# Altium PCB GPS.PcbDoc
Units mm, origin at the board's own origin, x right, y up, seen from the top; angles counter-clockwise.
Board outline 101.53 x 61.5 mm, 4 copper layers (Top Layer, GND, Power layer, Bottom Layer), stack 1.586 mm thick; 16 components, 24 nets, 85 pads, 40 vias.
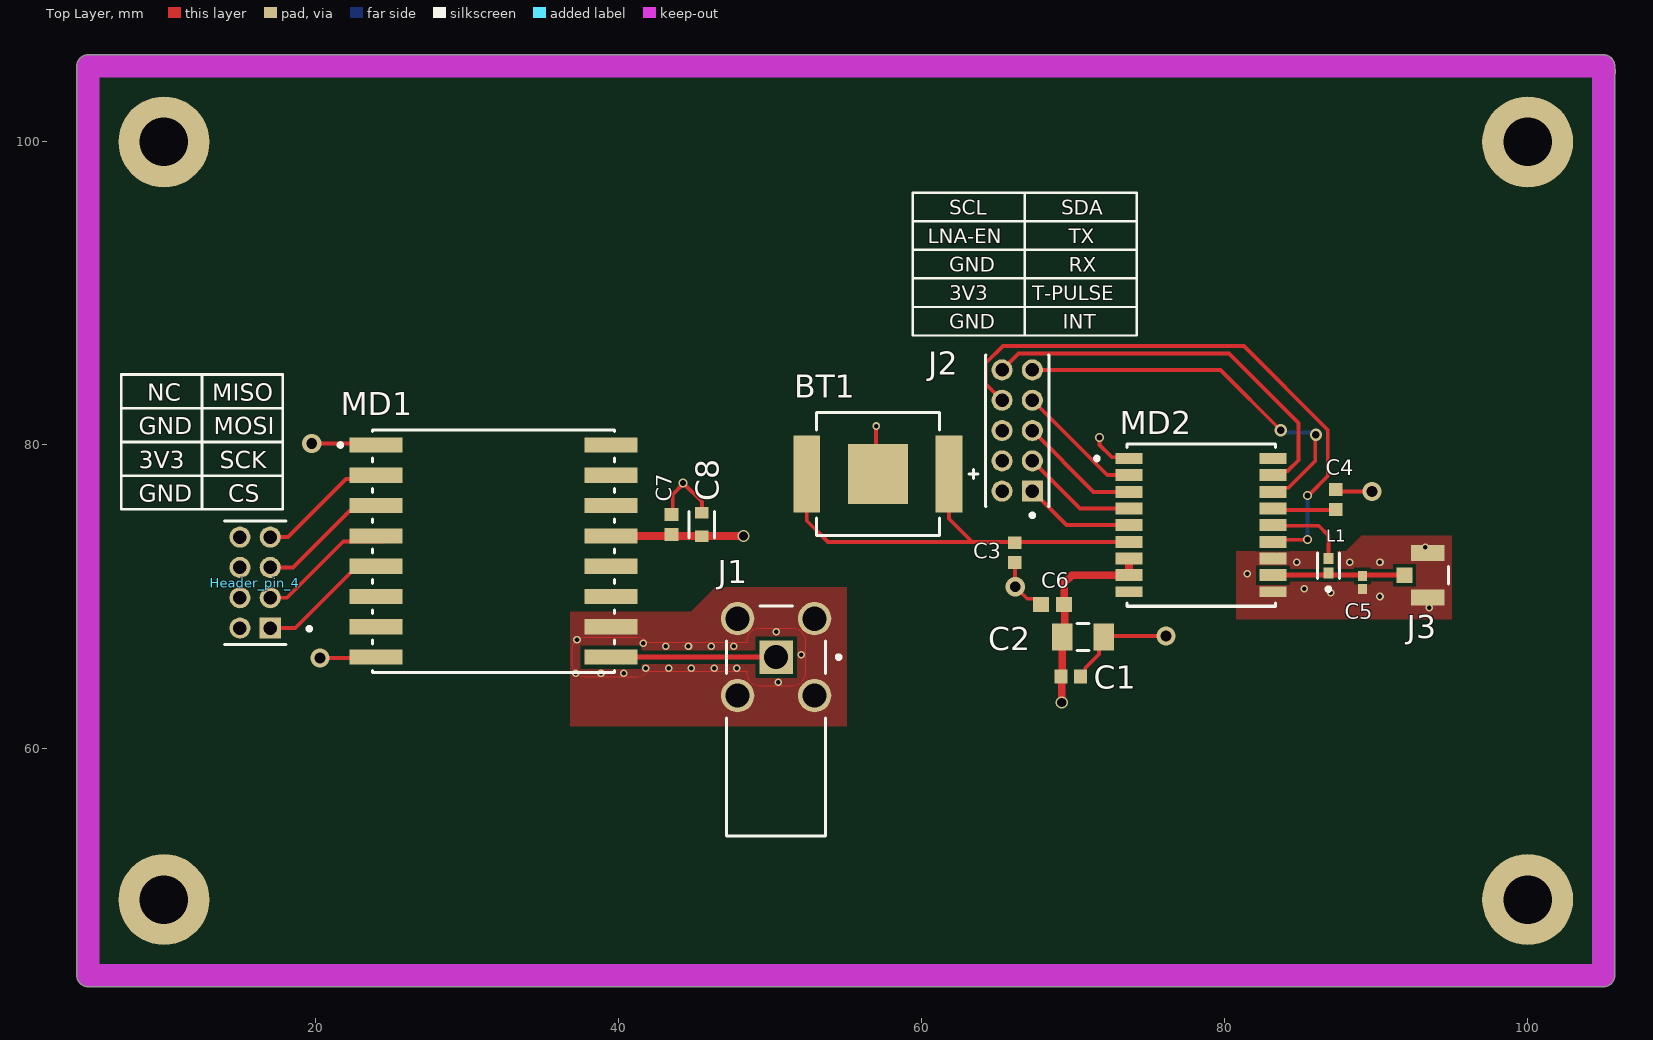
[diagram p0: Top Layer view]
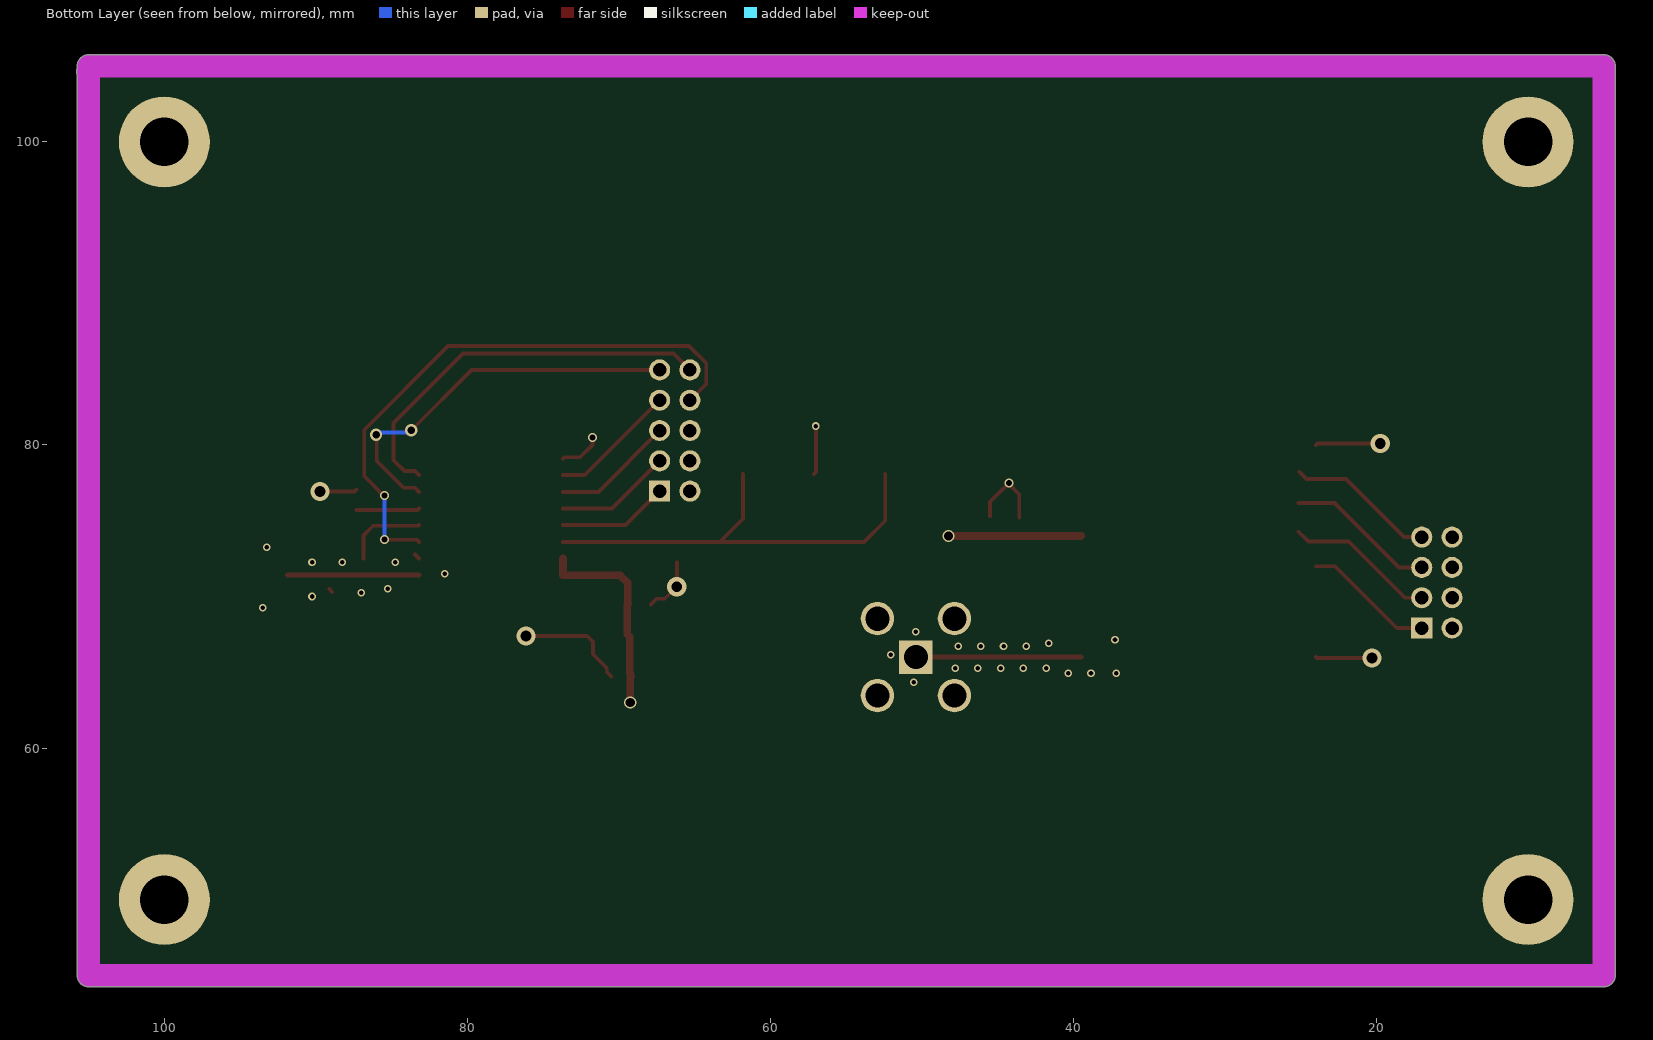
[diagram p1: Bottom Layer view, seen from below]
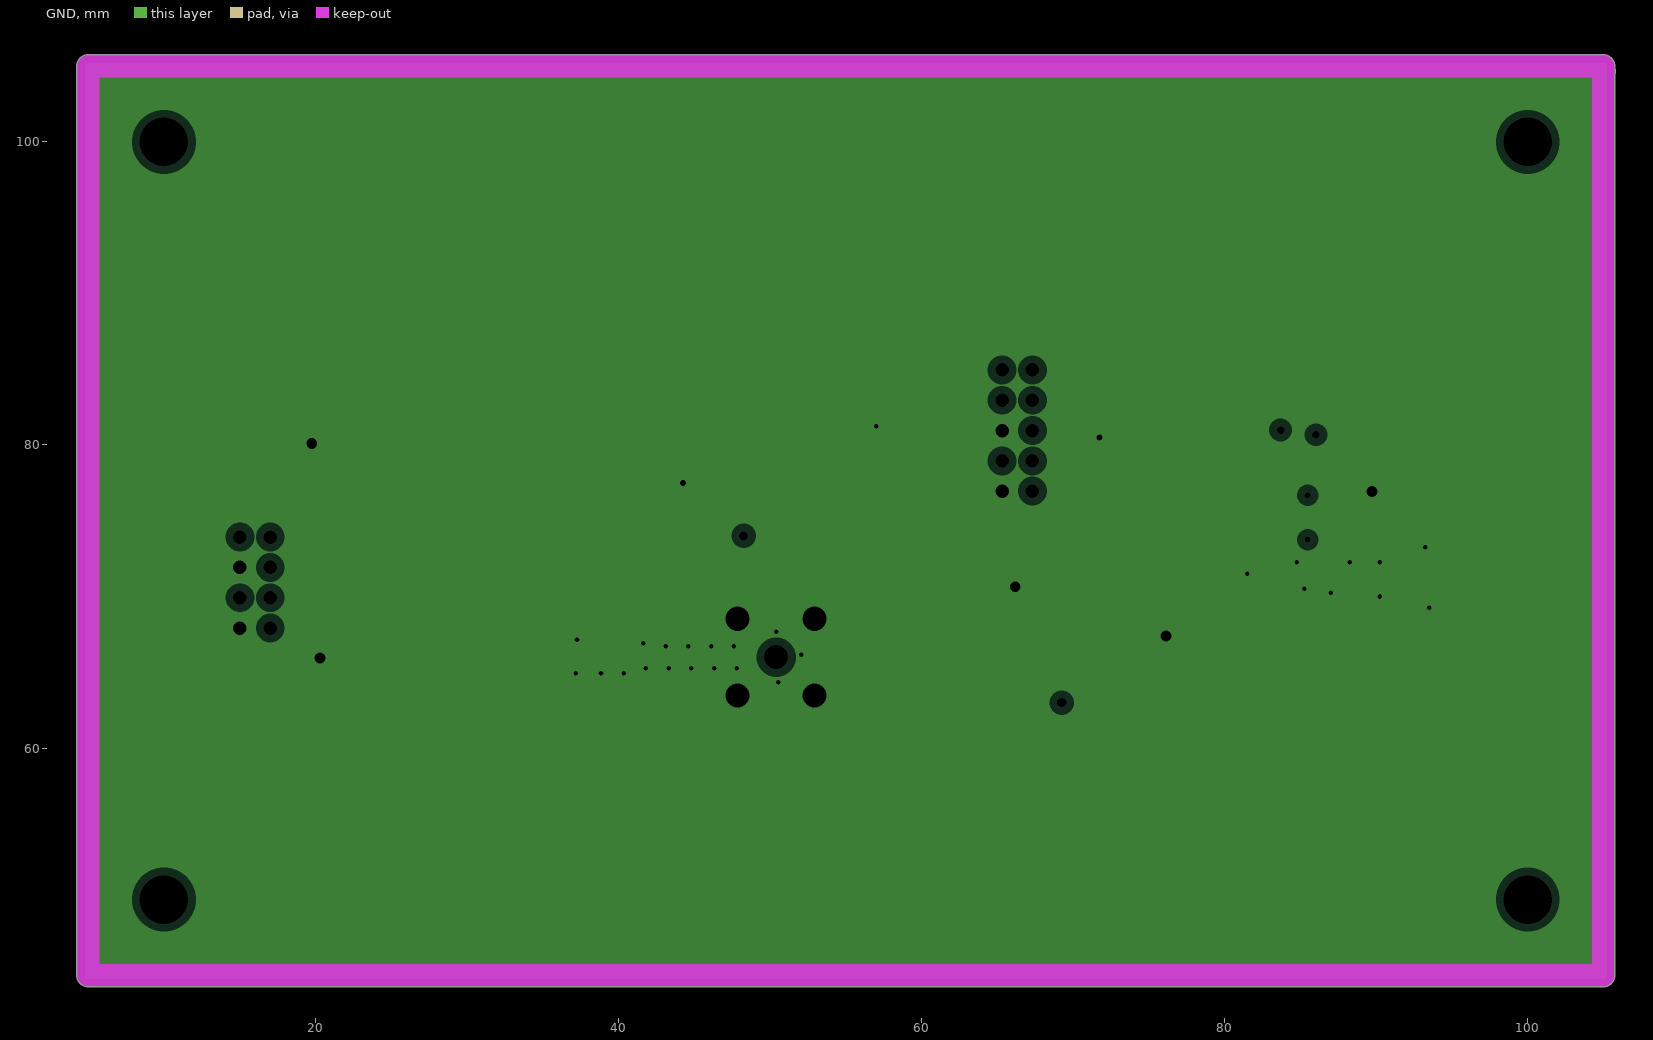
[diagram p2: GND, clearances drawn from the general rule]
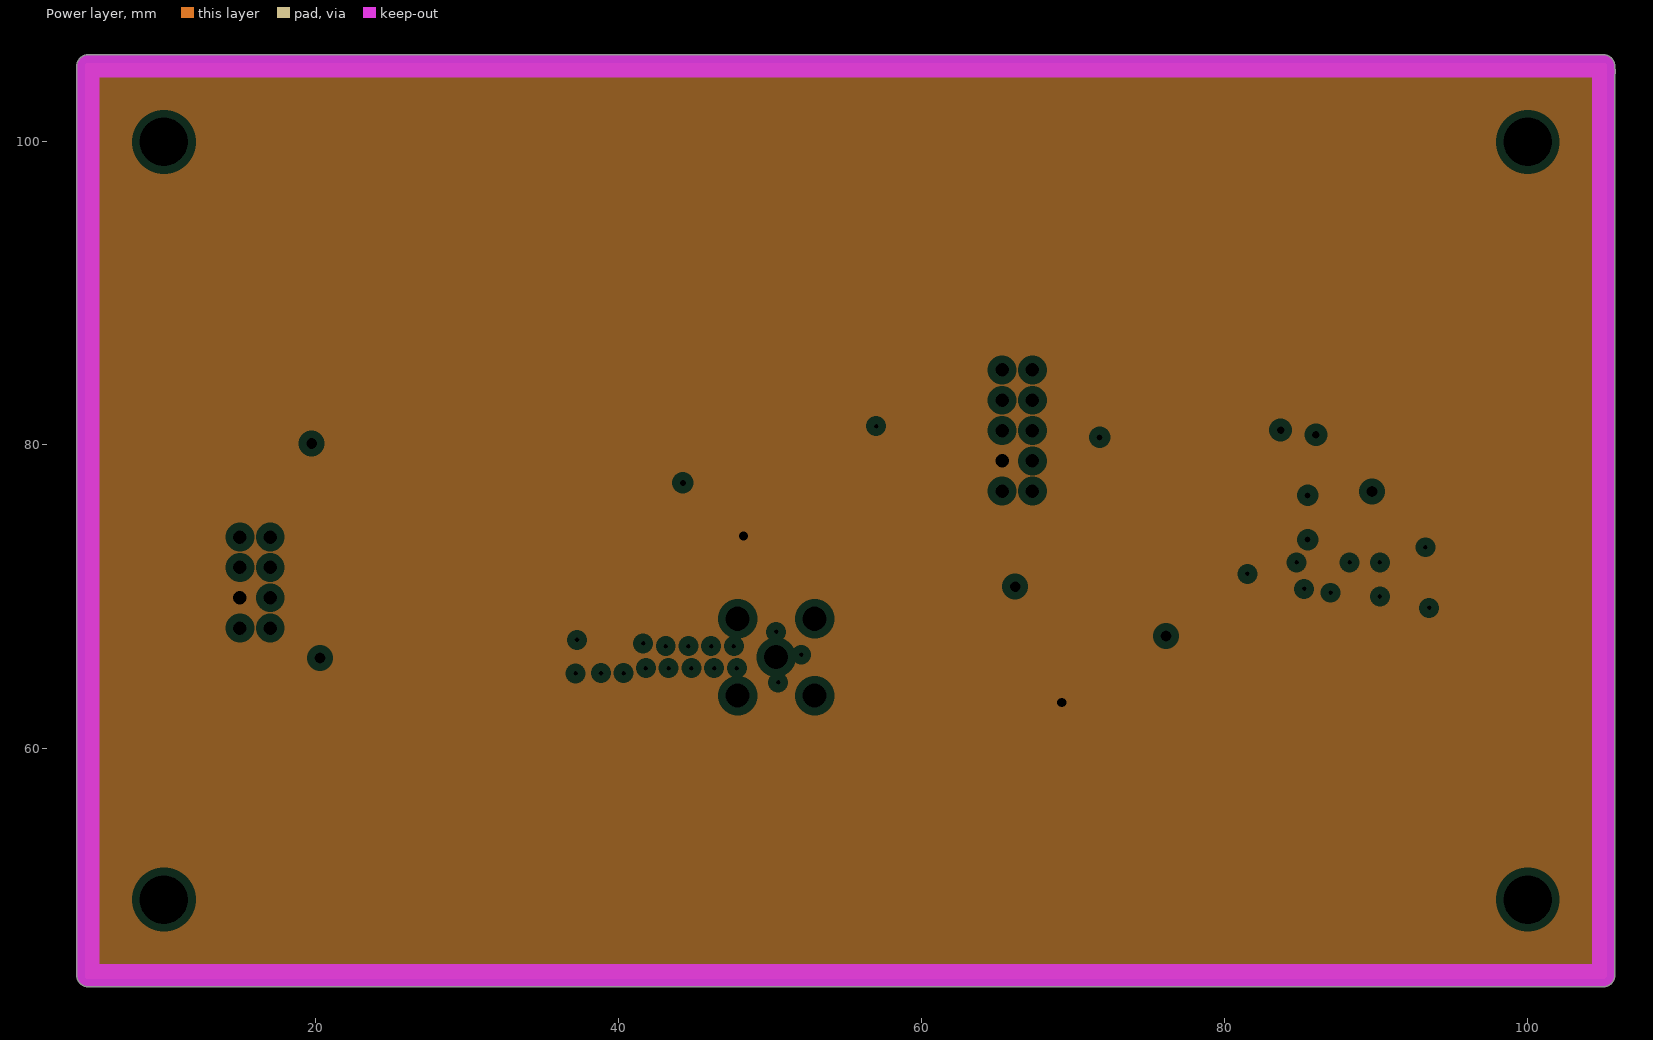
[diagram p3: Power layer, clearances drawn from the general rule]
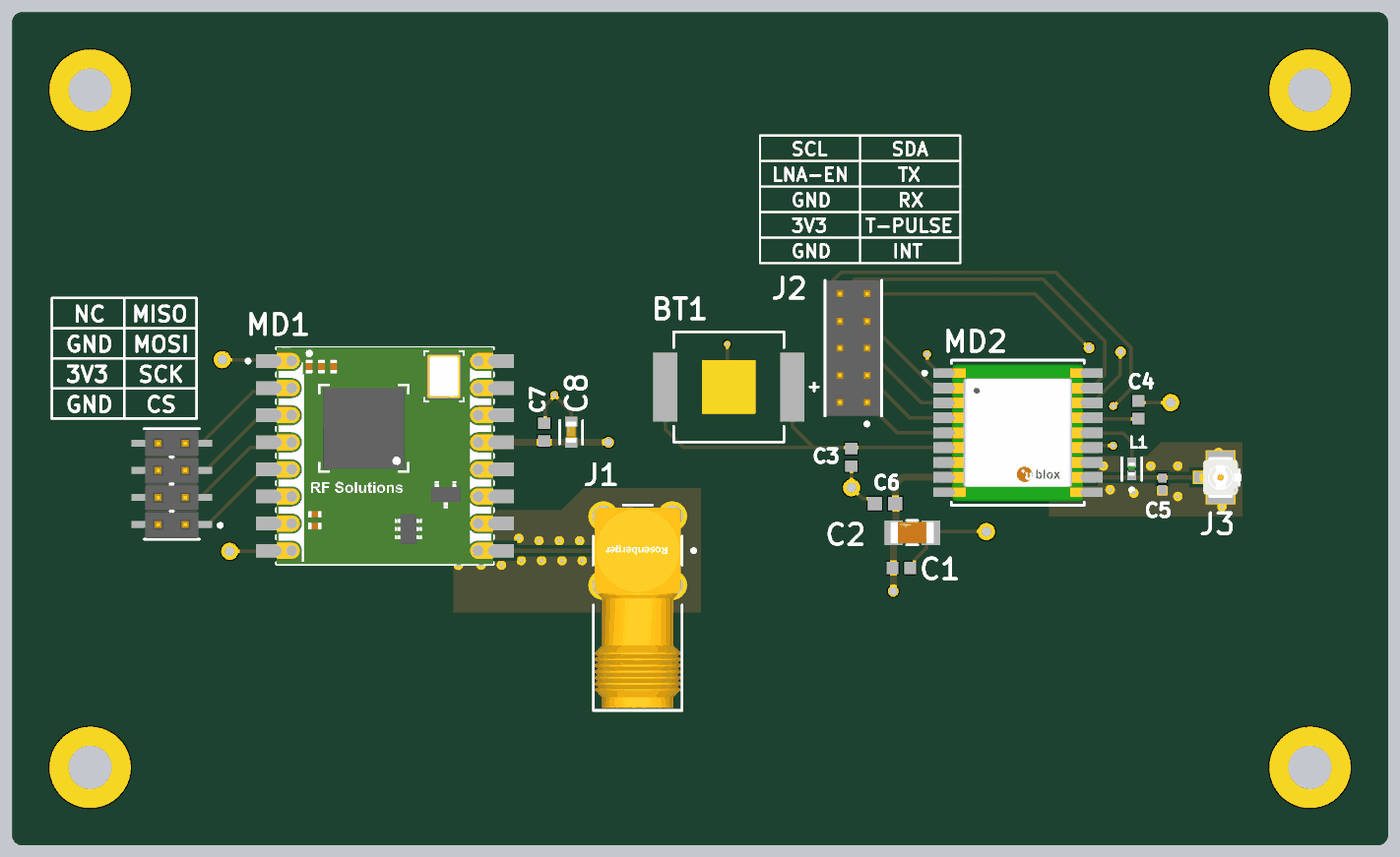
[diagram p4: 3D render of the assembled board from above, using the file's embedded part models]

## Layer stack, top to bottom
Top Solder: solder mask 0.0152, Solder Resist, Dk 3.8
Top Layer: signal copper 0.035
Dielectric 2: prepreg 0.2104, PP-006, Dk 4.4
GND: plane copper 0.0152, net GND
Dielectric 1: dielectric 1.065, FR-4, Dk 4.6
Power layer: plane copper 0.0152, net 3V3
Dielectric 3: prepreg 0.2104, PP-006, Dk 4.4
Bottom Layer: signal copper 0.035
Bottom Solder: solder mask 0.0152, Solder Resist, Dk 3.8

## Board outline
5,44.25 cw(c5,45) 4.25,45 4.25,105 cw(c5,105) 5,105.75 105,105.75 cw(c105,105) 105.75,105 105.75,104.842 cw(c105.025,104.65) 105.775,104.65 cw(c105.025,104.65) 105.75,104.458 105.75,45 cw(c105,45) 105,44.25

## Design rules (kind name [scope] priority, off if disabled: settings)
Clearance [All] p1: gap=0.254 ignorepadtopadclearanceinfootprint=TRUE
HoleSize [All] p1: absolutevalues=TRUE maxlimit=10 minlimit=0.2 maxpercent=80.000 minpercent=20.000
MinimumSolderMaskSliver [All] p1: minsoldermaskwidth=0.2
PlaneClearance [All] p1: clearance=0.508
PlaneConnect [All] p1: planeconnectstyle=Relief reliefexpansion=0.508 reliefentries=4 reliefconductorwidth=0.254 reliefairgap=0.254
PolygonConnect GNDConnect [InNet('GND') vs InNet('GND')] p1: connectstyle=Direct reliefconductorwidth=0.254 reliefentries=4 polygonreliefangle="90 Angle" airgapwidth=0.254
PolygonConnect [All] p2: connectstyle=Relief reliefconductorwidth=0.254 reliefentries=4 polygonreliefangle="90 Angle" airgapwidth=0.254
RoutingVias [All] p1: holewidth=0.3 width=0.5 viastyle="Through Hole" minholewidth=0.2 minwidth=0.35 maxholewidth=0.711 maxwidth=1.27
SilkToSolderMaskClearance [IsPad] p1: minsilkscreentomaskgap=0.2 clearancetoexposedcopper=TRUE
SolderMaskExpansion [All] p1: expansion=0.102 istentingtop=FALSE
SupplyNets "Schematic Supply Nets_2" [InNet('VCC')] p1: voltage=0.000
SupplyNets "Schematic Supply Nets_1" [InNet('3V3')] p2: voltage=0.000
SupplyNets "Schematic Supply Nets" [InNet('GND')] p3: voltage=0.000
Width Width_1 [InNetClass('RF')] p1: maxlimit=0.33 minlimit=0.33 preferedwidth=0.33 impedanceprofiledriven=TRUE impedanceprofileid={B25F2D5E-86D3-4013-A221-06050CDA0AEF} impedanceprofilevalue=50.000000 minimp=50.000000 maximp=50.000000 favimp=50.000000
Width [All] p2: maxlimit=1.27 minlimit=0.254 preferedwidth=0.254 minimp=50.000000 maximp=50.000000 favimp=50.000000
25 further rules are at their usual default settings.

## Classes and differential pairs
net class RF: NetC5_2 NetJ1_1
component class Radio_gps_module: BT1 C1 C2 C3 C4 C5 C6 C7 C8 Header_pin J2 J3 L1 MD1 MD2

## Components (designator, comment, footprint, x,y, rotation, side; value= is the part's Value field where it differs from the comment)
BT1 "2998" FP-2998-MFG 57.121,78.083 r180 top
C1 "06035C104KAZ2A" CAPC1608X90X35LL15T15 69.85,64.725 r180 top
C2 "GRM31CR71E106MA12K" FP-GRM31C-0_2-e0_3_0_8-IPC_B 70.65,67.325 r180 top
C3 "06035C104KAZ2A" CAPC1608X90X35LL15T15 66.15,72.9 r90 top
C4 "06035C104KAZ2A" CAPC1608X90X35LL15T15 87.325,76.4 r270 top
C5 "C0402C103K4RALTU" CAPC1005X60X30NL05T10 89.1,70.925 r90 top
C6 "06035C104KAZ2A" CAPC1608X90X35NL15T15 68.64,69.482 r0 top
C7 "06035C104KAZ2A" CAPC1608X90X35LL15T15 43.5,74.75 r270 top
C8 "GRM188R61A106KE69D" FP-GRM18-0_15-MFG 45.5,74.75 r90 top value=10uF (schematic designator C10uF)
Header_pin_4 "TMM-104-01-L-D" FP-TMM-104-01-L-D-MFG 16.018,70.92 r90 top
J1 "32K201-400L5" FP-32K201-400L5-MFG 50.4,61.787 r180 top
J2 "TMM-105-01-L-D" FP-TMM-105-01-L-D-MFG 66.31,80.953 r90 top
J3 "U.FL-R-SMT-1(10)" FP-U_FL-R-SMT-1_10-MFG 93.4,71.408 r90 top
L1 "LQG15HS27NH02D" FP-LQG15HH_02-IPC_A 86.85,72.025 r90 top (schematic designator Inductor)
MD1 "RFM95W-868S2" FP-RFM95W-868S2-MFG 31.75,73 r0 top
MD2 "MAX-M10S-00B" FP-MAX-M10S-00B-MFG 78.442,74.708 r0 top

## Footprints (in the part's own frame and the unit in brackets; to place one, negate y for a bottom-side part, rotate by r counter-clockwise, add the part's x,y. Pads: shape width x height; smd on the part's side, far side on the other; paste and mask are expansions set on the pad)
CAPC1005X60X30NL05T10 [mm] "Chip Capacitor, 2-Leads, Body 1.00x0.50mm, IPC Medium Density"
  rect 0.66x0.62 smd: 1(-0.43,0) 2(0.43,0)
  body extent -0.53,-0.28 0.53,0.27, height 0.6
CAPC1608X90X35LL15T15 [mm] "Chip Capacitor, 2-Leads, Body 1.60x0.81mm, IPC High Density"
  rect 0.85x0.9 smd: 1(-0.65,0) 2(0.65,0)
  body extent -0.88,-0.48 0.87,0.48, height 0.9
CAPC1608X90X35NL15T15 [mm] "Chip Capacitor, 2-Leads, Body 1.60x0.81mm, IPC Medium Density"
  rect 1.05x1 smd: 1(-0.75,0) 2(0.75,0)
  body extent -0.88,-0.48 0.87,0.48, height 0.9
FP-32K201-400L5-MFG [mm]
  rect 2.2x2.2 hole 1.6 paste-2539.97 mask+0: 1(0,-4.213)
  round 2.2 hole 1.6 paste-2539.97 mask+0: 2(-2.54,-1.673) 3(2.54,-1.673) 4(-2.54,-6.753) 5(2.54,-6.753)
  silkscreen extent -4.25,-7.59 3.27,7.59, body extent -3.74,-7.95 3.74,7.69, height 0.25
FP-2998-MFG [mil]
  rect 156x156 smd paste-39370.1 mask+0: 1(0,0)
  rect 70x200 smd paste+0 mask+0: 2(-185,0) 2(185,0)
  silkscreen extent -260,-160 160,160
FP-GRM18-0_15-MFG [mm]
  rect 0.75x0.9 smd paste+0 mask+0: 1(-0.775,0) 2(0.775,0)
  silkscreen extent -0.88,-0.83 0.87,0.85, body extent -1.25,-0.58 1.25,0.58, height 0.25
FP-GRM31C-0_2-e0_3_0_8-IPC_B [mm]
  rect 1.355x1.806 smd paste+0 mask+0: 1(-1.376,0) 2(1.376,0)
  silkscreen extent -0.4,-0.9 0.4,0.9, body extent -2.3,-1.15 2.3,1.15, height 0.25
FP-LQG15HH_02-IPC_A [mm]
  rect 0.715x0.672 smd paste+0 mask+0: 1(-0.479,0) 2(0.479,0)
  silkscreen extent -1.66,-0.74 0.84,0.74, body extent -1.04,-0.54 1.04,0.54, height 0.25
FP-MAX-M10S-00B-MFG [mm]
  rect 1.8x0.7 smd paste-1000 mask+0: 1(-4.75,4.4) 9(-4.75,-4.4) 10(4.75,-4.4) 18(4.75,4.4)
  rect 1.8x0.8 smd paste-1000 mask+0: 2(-4.75,3.3) 3(-4.75,2.2) 4(-4.75,1.1) 5(-4.75,0) 6(-4.75,-1.1) 7(-4.75,-2.2) 8(-4.75,-3.3) 11(4.75,-3.3) 12(4.75,-2.2) 13(4.75,-1.1) 14(4.75,0) 15(4.75,1.1) 16(4.75,2.2) 17(4.75,3.3)
  silkscreen extent -7,-5.35 4.9,5.35, body extent -5.75,-5.45 5.75,5.45, height 0.25
FP-RFM95W-868S2-MFG [mm]
  rect 3.5x1 smd paste+0 mask+0: 1(-7.75,7) 2(-7.75,5) 3(-7.75,3) 4(-7.75,1) 5(-7.75,-1) 6(-7.75,-3) 7(-7.75,-5) 8(-7.75,-7) 9(7.75,-7) 10(7.75,-5) 11(7.75,-3) 12(7.75,-1) 13(7.75,1) 14(7.75,3) 15(7.75,5) 16(7.75,7)
  silkscreen extent -10.22,-8 8,8, body extent -9.6,-8.1 9.6,8.1, height 0.25
FP-TMM-104-01-L-D-MFG [mm]
  rect 1.39x1.39 hole 0.89 paste-2539.97 mask+0: 1(-3,-1)
  round 1.39 hole 0.89 paste-2539.97 mask+0: 2(-3,1) 3(-1,-1) 4(-1,1) 5(1,-1) 6(1,1) 7(3,-1) 8(3,1)
  silkscreen extent -4.08,-3.7 4.08,2.03, body extent -4.1,-3.07 4.1,3.07, height 0.25
FP-TMM-105-01-L-D-MFG [mm]
  rect 1.39x1.39 hole 0.89 paste-2539.97 mask+0: 1(-4,-1)
  round 1.39 hole 0.89 paste-2539.97 mask+0: 2(-4,1) 3(-2,-1) 4(-2,1) 5(0,-1) 6(0,1) 7(2,-1) 8(2,1) 9(4,-1) 10(4,1)
  silkscreen extent -5.72,-2.09 5,2.09, body extent -5.1,-2.13 5.1,2.13, height 0.25
FP-U_FL-R-SMT-1_10-MFG [mm]
  rect 1x1.05 smd paste-1000 mask+0: 1(0,1.525)
  rect 1.05x2.2 smd paste-1000 mask+0: 2(-1.475,0) 3(1.475,0)
  silkscreen extent -0.58,-1.38 0.58,-1.38, body extent -2.1,-1.48 2.1,2.15, height 0.25

## Part data
BT1: library part CMP-19636-000010-1, "BATTERY RETAINER COIN 6.8MM SMD", Case/Package=SMD/SMT, Color=Silver, Package Quantity=100, Contact Material=Bronze, Height=2.9mm, Lead Free="Lead Free", Material=Bronze, Mount="Surface Mount", Number of Batteries=1, Number of Cells=1, REACH SVHC="No SVHC", Termination=SMD/SMT
C1 C3 C4 C6 C7: library part CMP-2006-04391-1, Manufacturer="AVX Interconnect / Elco", Part Number=06035C104KAZ2A
C2: library part CMP-06035-043219-1, "Chip Multilayer Ceramic Capacitors for General Purpose, 1206, 10uF, X7R, 15%, 20%, 25V"
C5: library part CMP-2008-02128-1, Manufacturer=Kemet, Part Number=C0402C103K4RALTU
C8: library part CMP-2000-05448-2, "CAP CER 10UF 10V X5R 0603", Capacitance=10uF, Manufacturer=Murata, Package=GRM18-0.15, Temperature="-55°C to +85°C", Temperature Characteristic=X5R, Temperature Coefficient=15%, Temperature Range High=+85°C, Temperature Range Low=-55°C, Tolerance=10%, Voltage Rating=10V, Automotive=No, Category=Cap, ComponentLink2Description=Datasheet, ComponentLink2URL=https://search.murata.co.jp/Ceramy/image/img/A01X/G101/ENG/GRM188R61A106KE69-01A.pdf, Device Class L1="Passive Components", Device Class L2=Capacitors, Device Class L3="Ceramic Capacitors", Digikey Description="CAP CER 10UF 10V X5R 0603", Height=0.95mm, Lead Free=Yes, Manufacturer Part Number=GRM188R61A106KE69D, Material=Ceramic, Mouser Description="Multilayer Ceramic Capacitors MLCC - SMD/SMT 0603 10uF 10volts X5R + - 10%", Octopart=https://octopart.com/grm188r61a106ke69d-murata-22851381, RoHS=TRUE
Header_pin_4: library part CMP-02766-001625-1, "CONN HEADER VERT 8POS 2MM", Housing Color=Black, Max Current Rating=3.9A, Max Operating Temperature=125°C, Max Voltage Rating (AC)=500V, Min Operating Temperature=-55°C, Connector Type=Header, Contact Finish - Mating=GOLD, Contact Material=Bronze, Contact Plating=Gold, Contact Shape=Square, Contact Type="Male Pin", Depth=3.94mm, Fastening Type=Pull, Gender=Male, Housing Material=Polymer, Insulation Color=Black, Insulation Material=Polymer, Lead Free="Lead Free", Length=8mm, Number Of Contacts=8, Number of Positions=8, Number of Rows=2, Orientation=Straight, Packaging=Bulk, Pitch=2mm, Radiation Hardening=No, REACH SVHC="No SVHC", RoHS Compliant=Yes, Series=TMM, Termination=Solder
J1: library part CMP-0751-00005-2, "CONN SMA JACK R/A 50OHM PCB", Case/Package=SMA, Dielectric Material=PTFE, Housing Color=Gold, Max Frequency=18GHz, Max Operating Temperature=165°C, Min Operating Temperature=-65°C, Voltage Rating=480V, Body Material=Brass, Body Plating=Gold, Center Contact Plating=Gold, Connector Type=SMA, Contact Material=Copper, Contact Plating=Gold, Fastening Type=Threaded, Gender=Female, Impedance=50R, Mating Cycles=500, Number of Ports=1, Packaging=Bulk, RoHS Compliant=Yes, Series=-, Termination=Solder
J2: library part CMP-02766-001634-1, "CONN HEADER VERT 10POS 2MM", Housing Color=Black, Max Current Rating=3.9A, Max Operating Temperature=125°C, Max Voltage Rating (AC)=500V, Min Operating Temperature=-55°C, Contact Material=Bronze, Contact Plating=Gold, Depth=3.94mm, Gender=Male, Housing Material=Polymer, Lead Free="Lead Free", Length=10mm, Number Of Contacts=10, Number of Rows=2, Orientation=Straight, Packaging=Bulk, Pitch=2mm, Radiation Hardening=No, REACH SVHC="No SVHC", RoHS Compliant=Yes, Termination=Solder
J3: library part CMP-2000-05152-3, "CONN U.FL RCPT STR 50 OHM SMD", Dielectric Material=Polymer, Frequency=6GHz, Housing Color=Beige, Insulation Resistance=500MR, Max Operating Temperature=90°C, Min Operating Temperature=-40°C, Package Quantity=2500, Body Material=Bronze, Body Plating=Silver, Connector Type=Coaxial, Contact Material=Brass, Contact Plating=Gold, Depth=3.1mm, Fastening Type=Snap, Gender=Male, Impedance=50R, Lead Free="Lead Free", Length=3mm, Max Frequency=6GHz, Mount="Surface Mount", Orientation=Straight, Packaging="Cut Tape", Radiation Hardening=No, REACH SVHC="No SVHC", Series=U.FL, Termination=Solder, Weight=0.001764oz, Wire/Cable Type=Coaxial
L1: library part CMP-06042-007099-1, "Multilayer type RF Inductor 27nH ±3% 0.46Ω 350mA 0402", Case Code (Imperial)=0402, Case Code (Metric)=1005, Current Rating=350mA, DC Resistance (DCR)=460mR, Inductance=27nH, Max Operating Temperature=125°C, Min Operating Temperature=-55°C, Self Resonant Frequency=1.7GHz, Test Frequency=100MHz, Tolerance=3%, Case/Package=0402, Core Material=Air, Mount="Surface Mount", Packaging="Tape and Reel", Shielding=Unshielded
MD1: library part CMP-204316-000001-1, "RX TXRX MODULE ISM < 1GHZ SMD", Case/Package=SMD/SMT, Current - Receiving=12.1mA, Current - Transmitting=120mA, Frequency=868MHz, Max Operating Temperature=70°C, Min Operating Temperature=-20°C, Data Rate=300Kbps, Interface=SPI, Mount="Surface Mount", Packaging=Bulk, Sensitivity=-123dBm
MD2: library part CMP-207130-000026-1, "GNSS LCC RX, ROM, TCXO, LNA, SAW"

## Free pads (board coordinates)
  round 6 hole 3.2: 1(10,50) 1(10,100) 1(100,50) 1(100,100)

## Via types
v1: diameter 0.5, hole 0.3, Top Layer to Bottom Layer, 27 vias
v2: diameter 1.27, hole 0.711, Top Layer to Bottom Layer, 5 vias
v3: diameter 0.6, hole 0.4, Top Layer to Bottom Layer, 4 vias
v4: diameter 0.8, hole 0.6, Top Layer to Bottom Layer, 2 vias
v5: diameter 0.8, hole 0.5, Top Layer to Bottom Layer, 2 vias

## Nets (pads, with @x,y where several pads share a name; then routed paths per layer and width w, separated by ;. In a path a pad name is that pad's centre, name@x,y a point inside that pad or via, vN(x,y) a via of type N, cw(c..) or ccw(c..) an arc to the next point about the centre after c; other vN are vias at no path point)
3V3: C1.2 C2.2 C6.2 C7.2 C8.1 Header_pin_4.4 J2.4 MD1.13 MD2.7 MD2.8 | length 22.2
  Top Layer w0.508: MD1.13 39.512,73.988 43.5,73.988 45.5,73.988 48.238,73.987 v4(48.25,74) ; C1.2 69.25,64.675 v4(69.25,63) ; C1.2@69.25,64.925 69.274,64.949 C2.2 69.454,67.505 C6.2@69.454,69.482 ; C6.2 69.425,69.517 69.425,70.9 69.933,71.408 MD2.8 MD2.7
GND: BT1.1 C1.1 C2.1 C3.1 C4.1 C5.1 C6.1 C7.1 C8.2 Header_pin_4.2 Header_pin_4.6 J1.2 J1.3 J1.4 J1.5 J2.2 J2.6 J3.2 J3.3 MD1.1 MD1.8 MD1.10 MD2.1 MD2.10 MD2.12 | length 34.2
  Top Layer w0.254: Header_pin_4.2@15,67.357 15.018,67.375 Header_pin_4.2 ; v2(19.75,80.1) 23.9,80.1 MD1.1 ; v2(20.3,65.95) 23.95,65.95 MD1.8 ; C7.1@43.575,75.2 43.575,76.738 44.25,77.413 v3(44.25,77.5) 45.5,76.25 C8.2@45.5,75.3 ; v1(57,81.25) 57,78.204 BT1.1 ; C3.1@66.175,72.247 v2(66.175,70.65) 66.97,69.855 67.517,69.855 C6.1 ; C1.1 70.798,65.023 70.798,65.273 71.715,66.19 71.715,67.014 C2.1 72.101,67.4 v2(76.125,67.4) ; v3(71.75,80.5) 71.75,80 72.56,79.19 73.61,79.19 MD2.1 ; MD2.12 MD2.12@83.452,72.768 ; C4.1 87.45,76.925 v2(89.725,76.925) ; C5.1@88.917,70.303 89.1,70.486 C5.1
  other v1: 50.536,64.339 37.176,64.926 38.844,64.939 40.344,64.939 41.806,65.271 43.306,65.271 44.806,65.271 46.306,65.271 47.806,65.271 52.061,66.159 43.117,66.729 44.617,66.729 46.117,66.729 47.617,66.729 41.628,66.909 37.26,67.139 50.396,67.661 93.5,69.25 90.25,70 87,70.25 85.25,70.5 81.5,71.5 84.75,72.25 88.25,72.25 90.25,72.25 93.25,73.25
NetC4_2: C4.2 MD2.15 | length 4.2
  Top Layer w0.254: MD2.15 83.287,75.713 C4.2@87.325,75.713
NetC5_2: C5.2 J3.1 L1.1 MD2.11 | length 8.7
  Top Layer w0.33: MD2.11 85.625,71.408 88.65,71.408 J3.1
NetHeader_pin_4_1: Header_pin_4.1 MD1.5 | length 8.7
  Top Layer w0.254: Header_pin_4.1 18.67,67.92 22.75,72 MD1.5
NetHeader_pin_4_3: Header_pin_4.3 MD1.4 | length 9.9
  Top Layer w0.254: Header_pin_4.3 18.129,69.92 21.836,73.627 24.5,73.627 MD1.4@25.143,74.27
NetHeader_pin_4_5: Header_pin_4.5 MD1.3 | length 9.9
  Top Layer w0.254: Header_pin_4.5 18.525,71.92 22.78,76.175 MD1.3@25.143,76.175
NetHeader_pin_4_7: Header_pin_4.7 MD1.2 | length 9.9
  Top Layer w0.254: Header_pin_4.7 18.192,73.92 22.018,77.746 24.635,77.746 MD1.2@25.096,78.207
NetInductor_2: L1.2 MD2.14 | length 5.5
  Top Layer w0.254: MD2.14 83.233,74.667 86.208,74.667 86.85,74.025 L1.2
NetJ1_1: J1.1 MD1.9 | length 10.9
  Top Layer w0.33: MD1.9 J1.1@50.435,66
NetJ2_1: J2.1 MD2.5 | length 7.3
  Top Layer w0.254: J2.1 69.555,74.708 MD2.5
NetJ2_3: J2.3 MD2.4 | length 7.7
  Top Layer w0.254: J2.3 70.455,75.808 MD2.4
NetJ2_5: J2.5 MD2.3 | length 8.1
  Top Layer w0.254: J2.5 71.355,76.908 MD2.3
NetJ2_7: J2.7 MD2.2 | length 8.4
  Top Layer w0.254: J2.7 72.255,78.008 MD2.2
NetJ2_8: J2.8 MD2.13 | length 38.4
  Top Layer w0.254: J2.8 64.234,84.029 64.234,85.399 65.372,86.537 81.268,86.537 86.806,80.998 86.806,77.952 85.529,76.675 v3(85.475,76.675) ; MD2.13 83.334,73.75 v3(85.475,73.75)
  Bottom Layer w0.254: v3(85.475,73.75) v3(85.475,76.675)
NetJ2_9: J2.9 MD2.16 | length 25.8
  Top Layer w0.254: J2.9 79.722,84.953 v5(83.7,80.975) ; MD2.16 83.465,77.181 84.204,77.181 85.975,78.952 v5@85.975,80.675
  Bottom Layer w0.254: v5(83.7,80.975) 83.85,80.825 85.875,80.825 v5(86.025,80.675)
NetJ2_10: J2.10 MD2.17 | length 26.4
  Top Layer w0.254: J2.10 66.386,86.029 80.278,86.029 84.868,81.439 84.868,78.995 84.154,78.281 83.465,78.281 MD2.17
NetMD1_6: MD1.6
NetMD1_7: MD1.7
NetMD1_11: MD1.11
NetMD1_12: MD1.12
NetMD1_14: MD1.14
NetMD1_15: MD1.15
VCC: BT1.2 C3.2 MD2.6 | length 30
  Top Layer w0.254: BT1.2@52.422,78.083 52.422,75.003 53.817,73.608 63.344,73.608 ; BT1.2@61.82,78.083 61.82,75.132 63.344,73.608 ; MD2.6 63.344,73.608
pads on no net: Header_pin_4.8 MD1.16 MD2.9 MD2.18

## Polygon pours and split planes (outlines as drawn)
GND on Top Layer (solid, pour order 5): 51.71,67.884 51.906,67.803 52.074,67.674 52.203,67.506 52.284,67.31 52.312,67.1 52.312,64.9 52.284,64.69 52.203,64.494 52.074,64.326 51.906,64.197 51.71,64.116 51.5,64.088 49.3,64.088 49.09,64.116 48.894,64.197 48.726,64.326 48.597,64.494 48.516,64.69 48.488,64.9 48.488,65.02 41.896,65.02 41.824,64.926 41.656,64.797 41.46,64.716 41.25,64.688 37.75,64.688 37.54,64.716 37.344,64.797 37.176,64.926 37.047,65.094 36.966,65.29 36.938,65.5 36.938,66.5 36.966,66.71 37.047,66.906 37.176,67.074 37.344,67.203 37.54,67.284 37.75,67.312 41.25,67.312 41.46,67.284 41.656,67.203 41.824,67.074 41.896,66.98 48.488,66.98 48.488,67.1 48.516,67.31 48.597,67.506 48.726,67.674 48.894,67.803 49.09,67.884 49.3,67.912 51.5,67.912
GND on Top Layer "GND_L01_P003" (solid, pour order 3): 80.75,68.5 95,68.5 95,74 89,74 88,73 80.75,73
GND on Top Layer "GND_L01_P002" (solid, pour order 2): 44.775,69 46.4,70.625 55.05,70.625 55.05,61.425 36.8,61.425 36.8,69
GND on GND (split plane): 105.063,105.234 105.121,105.21 105.171,105.171 105.21,105.121 105.234,105.063 105.241,105.009 105.24,105 105.24,104.842 105.25,104.742 105.259,104.712 105.266,104.659 105.265,104.65 105.266,104.641 105.259,104.588 105.25,104.558 105.24,104.458 105.24,45 105.241,44.991 105.234,44.937 105.21,44.879 105.171,44.829 105.121,44.79 105.063,44.766 105.009,44.759 105,44.76 5,44.76 4.991,44.759 4.937,44.766 4.879,44.79 4.829,44.829 4.791,44.879 4.766,44.937 4.759,44.991 4.76,45 4.76,105 4.759,105.009 4.766,105.063 4.791,105.121 4.829,105.171 4.879,105.21 4.937,105.234 4.991,105.241 5,105.24 105,105.24 105.009,105.241
3V3 on Power layer (split plane): 105.063,105.234 105.121,105.21 105.171,105.171 105.21,105.121 105.234,105.063 105.241,105.009 105.24,105 105.24,104.842 105.25,104.742 105.259,104.712 105.266,104.659 105.265,104.65 105.266,104.641 105.259,104.588 105.25,104.558 105.24,104.458 105.24,45 105.241,44.991 105.234,44.937 105.21,44.879 105.171,44.829 105.121,44.79 105.063,44.766 105.009,44.759 105,44.76 5,44.76 4.991,44.759 4.937,44.766 4.879,44.79 4.829,44.829 4.791,44.879 4.766,44.937 4.759,44.991 4.76,45 4.76,105 4.759,105.009 4.766,105.063 4.791,105.121 4.829,105.171 4.879,105.21 4.937,105.234 4.991,105.241 5,105.24 105,105.24 105.009,105.241

## Keep-outs
Keep-Out Layer:
  lines w1.5: 105.025,104.65 104.675,105 5,105 ; 5,105 5,45 105,45 105,105 5,105

## Silkscreen, mask and mechanical layers (free items; w line width, h text height)
Top Overlay:
  lines w0.151: 59.423,89.112 74.192,89.112 ; 59.423,90.996 74.192,90.996 ; 59.423,92.88 74.192,92.88 ; 59.423,94.763 74.192,94.763 ; 66.808,87.228 66.808,96.647 ; 59.423,87.228 59.423,96.647 74.192,96.647 74.192,87.228 59.423,87.228
  lines w0.178: 7.175,77.973 17.852,77.973 ; 7.175,80.197 17.852,80.197 ; 7.175,82.421 17.852,82.421 ; 12.514,75.749 12.514,84.646 ; 7.175,75.749 7.175,84.646 17.852,84.646 17.852,75.749 7.175,75.749
  text "SCL" at 61.84,95.189 h0.96
  text "SDA" at 69.224,95.189 h0.96
  text "LNA-EN" at 60.405,93.305 h0.96
  text "TX" at 69.703,93.305 h0.96
  text "GND" at 61.84,91.422 h0.96
  text "RX" at 69.703,91.422 h0.96
  text "3V3" at 61.84,89.538 h0.96
  text "T-PULSE" at 67.311,89.538 h0.96
  text "GND" at 61.84,87.654 h0.96
  text "INT" at 69.304,87.654 h0.96
  text "NC" at 8.903,82.924 h1.13
  text "MISO" at 13.206,82.924 h1.13
  text "GND" at 8.338,80.7 h1.13
  text "MOSI" at 13.3,80.7 h1.13
  text "3V3" at 8.338,78.476 h1.13
  text "SCK" at 13.677,78.476 h1.13
  text "GND" at 8.338,76.252 h1.13
  text "CS" at 14.241,76.252 h1.13